# Altium PCB Power-Switcher-v1.0.PcbDoc
Units mil, origin at the board's own origin, x right, y up, seen from the top; angles counter-clockwise.
Board outline 3175 x 2355.83 mil, 2 copper layers (Top Layer, Bottom Layer), stack 61.811 mil thick; 33 components, 17 nets, 84 pads, 15 vias.
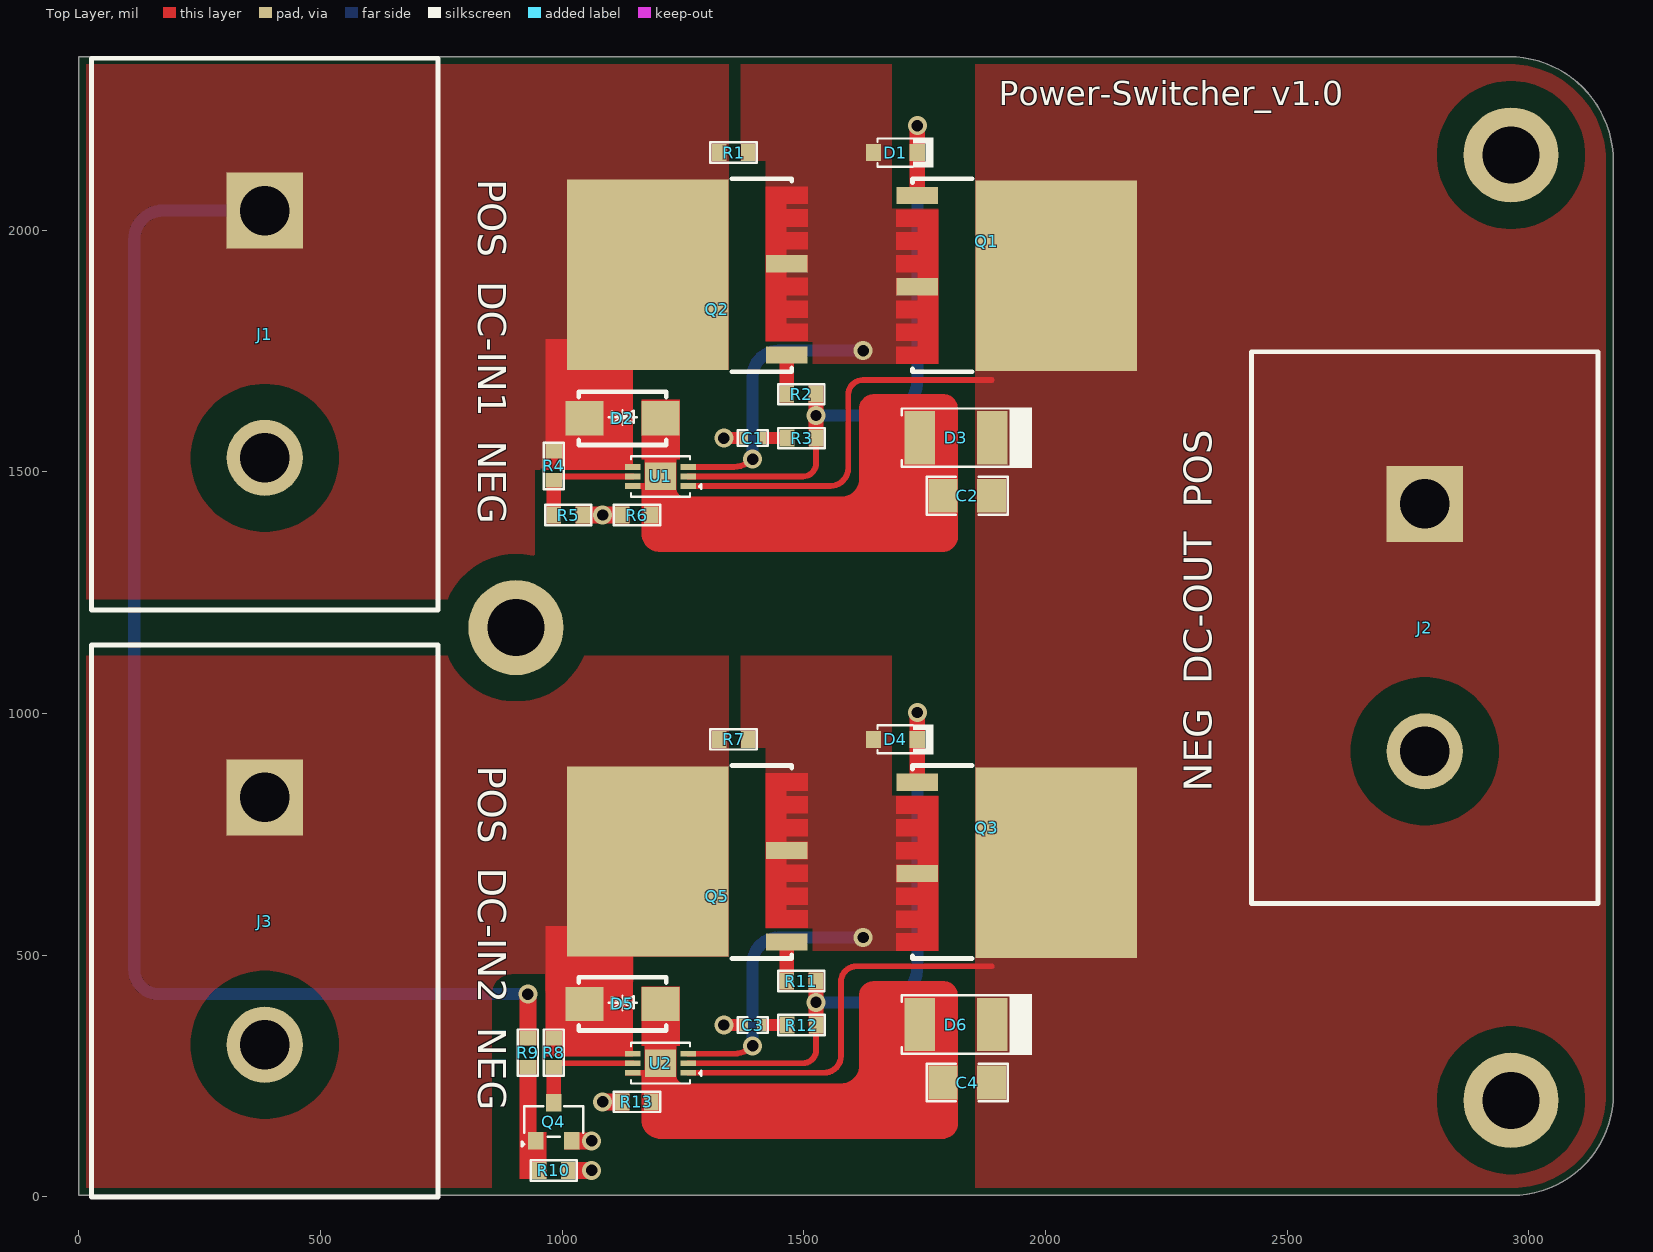
[diagram p0: Top Layer view]
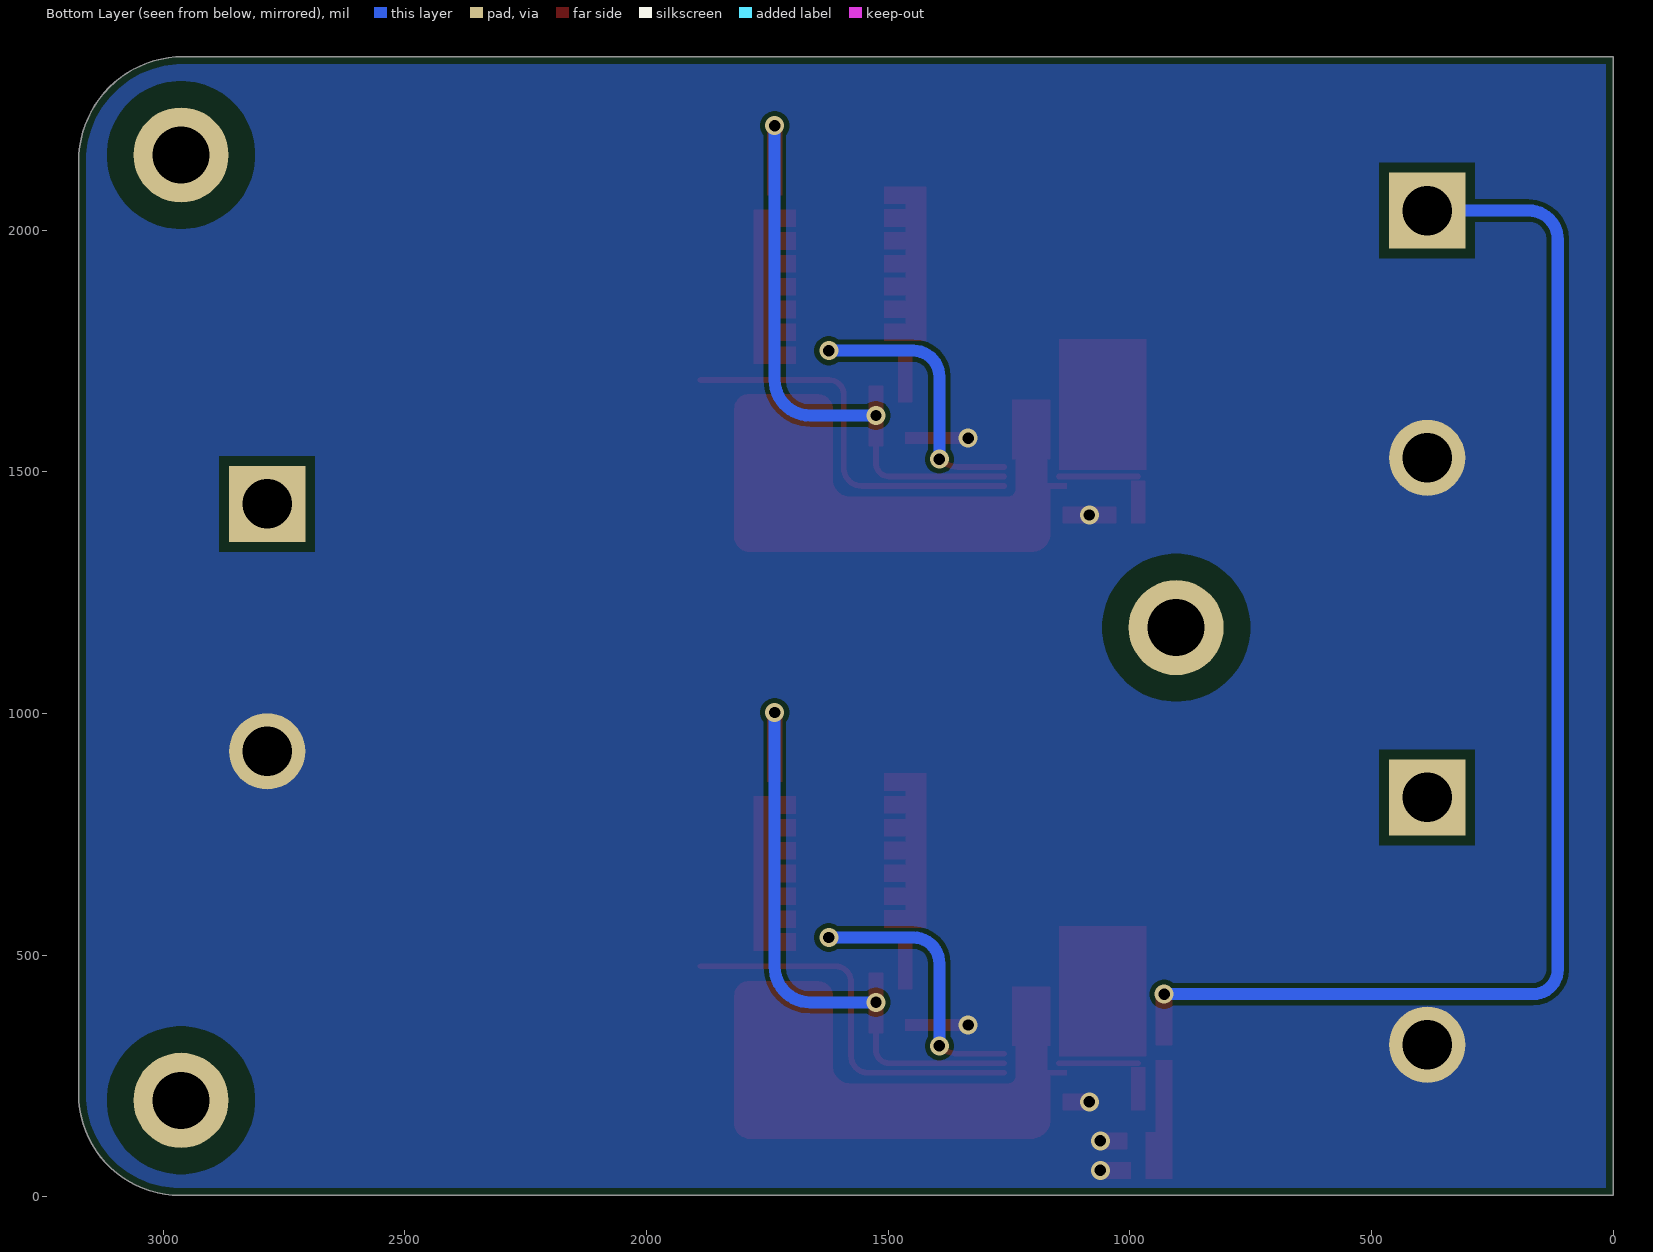
[diagram p1: Bottom Layer view, seen from below]
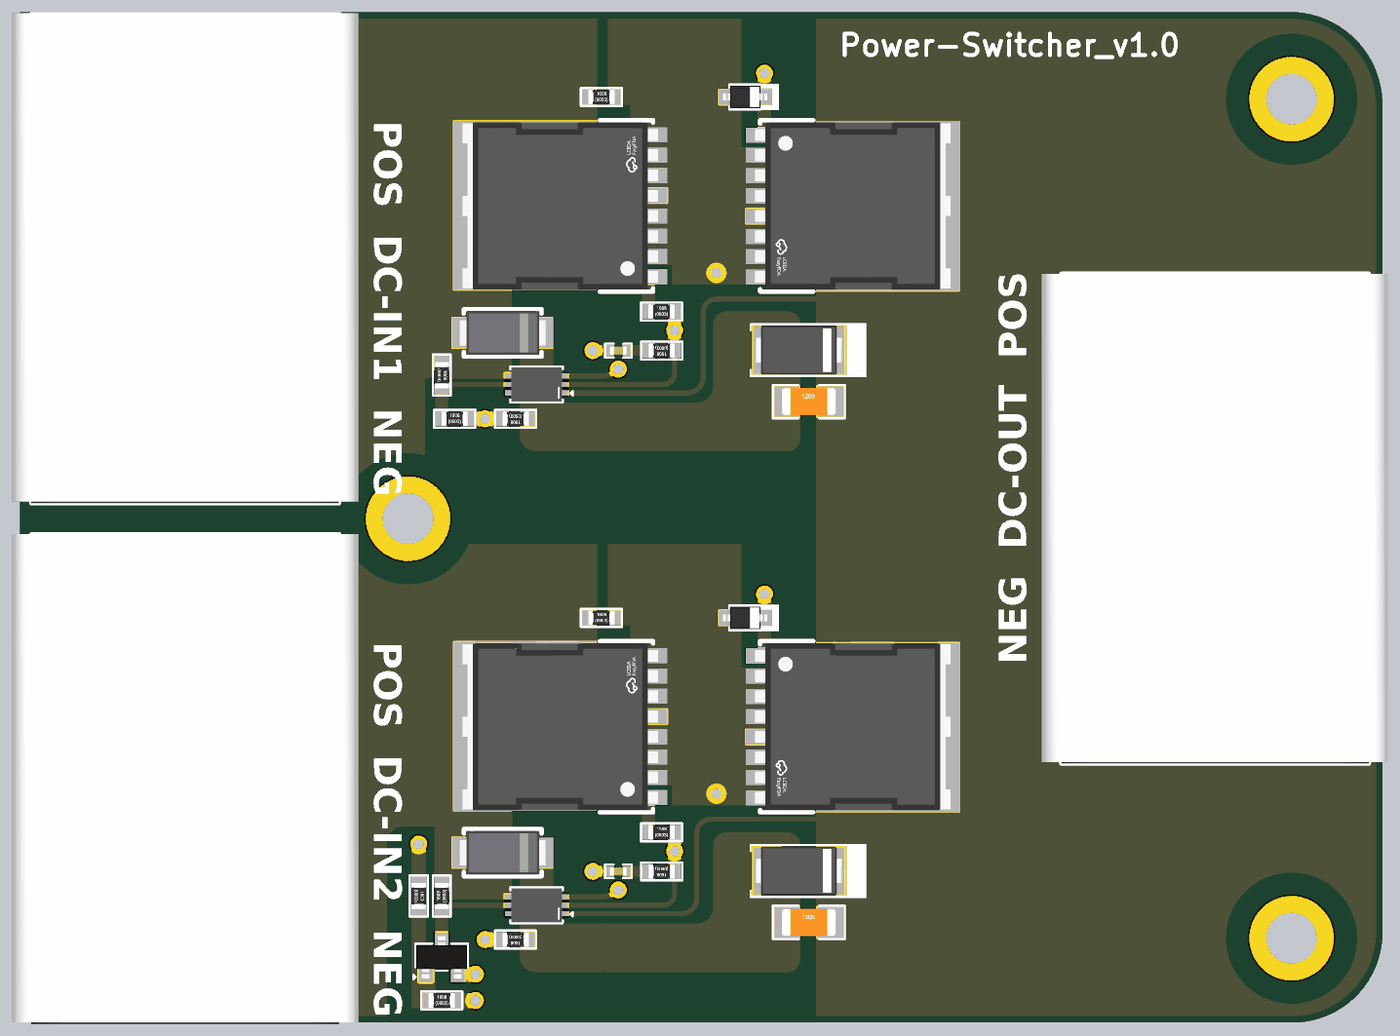
[diagram p2: 3D render of the assembled board from above, using the file's embedded part models]

## Layer stack, top to bottom
Top Solder: solder mask 0.394, Solder Resist, Dk 3.5
Top Layer: signal copper 1.378
Dielectric 1: dielectric 59.055, FR-4, Dk 4.6
Bottom Layer: signal copper 1.378
Bottom Solder: solder mask 0.394, Solder Resist, Dk 3.5

## Board outline
0,3.33 0,2359.16 2896.54,2359.16 2958.5,2359.16 cw(c2958.5,2142.66) 3175,2142.66 3175,212.99 cw(c2965.33,212.99) 2965.33,3.33 2922.67,3.33 2896.54,3.33

## Design rules (kind name [scope] priority, off if disabled: settings)
BoardOutlineClearance [All] p1: gap=0 ignorepadtopadclearanceinfootprint=FALSE except(10: Arc-OutlineEdge SMDPad-OutlineEdge THPad-OutlineEdge Via-OutlineEdge Fill-OutlineEdge; 15: Poly-OutlineEdge)
Clearance Clearance_DIFF [InAnyDifferentialPair] p1: gap=10 ignorepadtopadclearanceinfootprint=FALSE except(6: Arc-SMDPad Track-SMDPad SMDPad-SMDPad; 7: Arc-Track Arc-Fill Track-Track Track-Via Track-Fill Track-Region Track-Text SMDPad-Fill SMDPad-Region THPad-THPad Fill-Fill; 8: Region-Region; 20: THPad-Poly Fill-Poly Poly-Poly Poly-Region)
Clearance [All] p2: gap=10 ignorepadtopadclearanceinfootprint=FALSE except(4: SMDPad-SMDPad; 6: Arc-SMDPad Track-SMDPad; 7: Arc-Track Arc-Fill Track-Track Track-Via Track-Fill Track-Region Track-Text SMDPad-Fill SMDPad-Region THPad-THPad Fill-Fill; 8: Region-Region; 20: THPad-Poly Fill-Poly Poly-Poly Poly-Region)
ComponentClearance [All] p1: gap=0 collisioncheckmode=3 verticalgap=0 showdistances=FALSE
DiffPairsRouting DIFF_CAN1 [InDifferentialPairClass('DIFF_CAN')] p1: maxlimit=7 minlimit=7 mostfreqgap=7 toplayer_minwidth=7 toplayer_maxwidth=7 toplayer_prefwidth=7 bottomlayer_minwidth=7 bottomlayer_maxwidth=7 bottomlayer_prefwidth=7 impedanceprofiledriven=TRUE impedanceprofileid={AF431588-A3C0-40A6-A26B-CB03469C8758} impedanceprofilevalue=120.000000 maxuncoupledlength=500
DiffPairsRouting DIFF_RS485 [InDifferentialPairClass('DIFF_RS485')] p2: maxlimit=7 minlimit=7 mostfreqgap=7 toplayer_minwidth=7 toplayer_maxwidth=7 toplayer_prefwidth=7 bottomlayer_minwidth=7 bottomlayer_maxwidth=7 bottomlayer_prefwidth=7 impedanceprofiledriven=TRUE impedanceprofileid={AF431588-A3C0-40A6-A26B-CB03469C8758} impedanceprofilevalue=120.000000 maxuncoupledlength=500
HoleSize [All] p1: absolutevalues=TRUE maxlimit=137.8 minlimit=1 maxpercent=80.000 minpercent=20.000
MinimumSolderMaskSliver [All] p1: minsoldermaskwidth=0
PolygonConnect [All] p1: connectstyle=Direct reliefconductorwidth=10 reliefentries=4 polygonreliefangle="90 Angle" airgapwidth=10
RoutingVias [All] p1: holewidth=11.81 width=23.62 viastyle="Through Hole" minholewidth=7.87 minwidth=15.75 maxholewidth=23.62 maxwidth=39.37
SilkToSilkClearance [All] p1: silktosilkclearance=0
SilkToSolderMaskClearance [IsPad] p1: minsilkscreentomaskgap=0 clearancetoexposedcopper=TRUE
SolderMaskExpansion [All] p1: expansion=4 istentingtop=FALSE
SupplyNets "Schematic Supply Nets_5" [InNet('IN-2')] p1: voltage=0.000
SupplyNets "Schematic Supply Nets_4" [InNet('IN-1')] p2: voltage=0.000
SupplyNets "Schematic Supply Nets_3" [InNet('12V')] p3: voltage=0.000
SupplyNets "Schematic Supply Nets_7" [InNet('GND')] p4: voltage=0.000
Width [All] p1: maxlimit=100 minlimit=4 preferedwidth=6 minimp=50.000000 maximp=50.000000 favimp=50.000000
24 further rules are at their usual default settings.

## Components (designator, comment, footprint, x,y, rotation, side; value= is the part's Value field where it differs from the comment)
C1 "10nF" Cap-0402 1394.32,1569.86 r0 top
C2 "0.047uF" Cap-1206 1838.31,1450.87 r0 top
C3 "10nF" Cap-0402 1394.32,355.77 r0 top
C4 "0.047uF" Cap-1206 1838.34,236.8 r0 top
D1 "MMSZ5242BS-7-F" SOD-323 1689.72,2160.87 r180 top
D2 "SMAJ24CA" "SMA Bi Directional" 1125,1610.87 r180 top
D3 "S1B-13-F" SMA(DO-214AC) 1815,1570.87 r180 top
D4 "MMSZ5242BS-7-F" SOD-323 1689.72,946.77 r180 top
D5 "SMAJ24CA" "SMA Bi Directional" 1125.08,399.45 r180 top
D6 "S1B-13-F" SMA(DO-214AC) 1815,356.77 r180 top
J1 "KF78C-13.0-2P" KF78C-13.0-2P 385,1784.96 r270 top
J2 "KF78C-13.0-2P" KF78C-13.0-2P 2785,1177.91 r270 top
J3 "KF78C-13.0-2P" KF78C-13.0-2P 385,570.87 r270 top
Q1 "AOTL66912" Tolla 1878.7,1977.71 r270 top
Q2 "AOTL66912" Tolla 1321.3,1836.38 r90 top
Q3 "AOTL66912" Tolla 1878.7,763.62 r270 top
Q4 "MMBTA06-7-F" SOT-23 982.86,155.5 r0 top
Q5 "AOTL66912" Tolla 1321.3,622.28 r90 top
R1 "DNP" Res-0603 1355,2160.87 r180 top value=100kR
R2 "10R" Res-0603 1495,1660.87 r180 top
R3 "10K" Res-0603 1495.51,1569.86 r0 top
R4 "1K" Res-0603 982.86,1512.55 r90 top
R5 "10K" Res-0603 1012.86,1410.87 r180 top
R6 "1K" Res-0603 1155,1410.87 r0 top
R7 "DNP" Res-0603 1355,946.77 r180 top value=100kR
R8 "10K" Res-0603 982.86,298.46 r270 top
R9 "10K" Res-0603 929.32,298.46 r90 top
R10 "100K" Res-0603 982.86,54.87 r180 top value=100kR
R11 "10R" Res-0603 1495,446.77 r180 top
R12 "10K" Res-0603 1495.51,355.77 r0 top
R13 "1K" Res-0603 1155,196.77 r0 top
U1 "LTC4359HDCB#TRPBF" DFN-6-EP(2x3) 1203.74,1490.87 r180 top
U2 "LTC4359HDCB#TRPBF" DFN-6-EP(2x3) 1203.74,276.77 r180 top

## Footprints (in the part's own frame and the unit in brackets; to place one, negate y for a bottom-side part, rotate by r counter-clockwise, add the part's x,y. Pads: shape width x height; smd on the part's side, far side on the other; paste and mask are expansions set on the pad)
Cap-0402 [mil]
  rect 18x25 smd mask+2.36: 1(-18.5,0) 2(18.5,0)
  silkscreen extent -31,-16 31,16, body extent -20,-10 20,10, height 19
Cap-1206 [mil] "SMD 1206"
  rect 60x70 smd: 1(-50,0) 2(50,0)
  silkscreen extent -84,-39 84,39, body extent -63,-31 63,32, height 39
DFN-6-EP(2x3) [mil]
  rect 32x12 smd: 1(-57,19.69) 2(-57,0) 3(-57,-19.68) 4(57,-19.68) 5(57,0) 6(57,19.69)
  rect 65x57 smd: 7(0,0)
  silkscreen extent -85,-42 61,42, body extent -59,-39 59,39, height 31
KF78C-13.0-2P [mm]
  rect 4x4 hole 2.6 paste-2539.97 mask+0.051: 1(-6.5,0)
  round 4 hole 2.6 paste-2539.97 mask+0.051: 2(6.5,0)
  silkscreen extent -14.5,-9.1 14.5,9.1, body extent -14.5,-10.25 14.5,10.25, height 22
Res-0603 [mil]
  rect 30x35 smd: 1(-30,0) 2(30,0)
  silkscreen extent -48,-21 48,21, body extent -31,-17 31,17, height 18
"SMA Bi Directional" [mm]
  rect 2x1.8 smd paste+0 mask+0.051: 1(-2,0) 2(2,0)
  silkscreen extent -2.3,-1.4 2.3,1.4, body extent -2.6,-1.3 2.6,1.3, height 2.4
SMA(DO-214AC) [mm]
  rect 1.6x2.8 smd: 1(-1.9,0) 2(1.9,0)
  silkscreen extent -3.99,-1.6 2.84,1.6, body extent -2.6,-1.45 2.6,1.45, height 2.3
SOD-323 [mm]
  rect 0.8x0.9 smd mask+0.055: 1(-1.15,0) 2(1.15,0)
  silkscreen extent -2.01,-0.79 0.94,0.79, body extent -1.3,-0.67 1.3,0.67, height 1.1
SOT-23 [mm] "TRANS NPN 40V 0.6A SOT23"
  rect 0.82x0.92 smd: 1(-0.95,-1) 2(0.95,-1) 3(0,1)
  silkscreen extent -1.68,-1.3 1.55,0.81, body extent -1.5,-1.25 1.5,1.25, height 1.05
Tolla [mm]
  rect 0.9x2.2 smd paste-100 mask+0.05: 1(-2.4,-3.65) 2(2.4,-3.65)
  rect 10x8.5 smd paste-100 mask+0.05: 3(1.825,3.65)
  Top Layer region: -1.65,-2.55 -1.65,-4.75 -1.65,-4.75 -0.75,-4.75 -0.75,-4.75 -0.75,-3.615 -0.75,-3.615 -0.45,-3.615 -0.45,-3.615 -0.45,-4.75 -0.45,-4.75 0.45,-4.75 0.45,-4.75 0.45,-3.615 0.45,-3.615 0.75,-3.615 0.75,-3.615 0.75,-4.75 0.75,-4.75 1.65,-4.75 1.65,-4.75 1.65,-3.615 1.65,-3.615 1.95,-3.615 1.95,-3.615 1.95,-4.75 1.95,-4.75 2.85,-4.75 2.85,-4.75 2.85,-3.615 2.85,-3.615 3.15,-3.615 3.15,-3.615 3.15,-4.75 3.15,-4.75 4.05,-4.75 4.05,-4.75 4.05,-3.615 4.05,-3.615 4.35,-3.615 4.35,-3.615 4.35,-4.75 4.35,-4.75 5.25,-4.75 5.25,-4.75 5.25,-3.615 5.25,-3.615 5.55,-3.615 5.55,-3.615 5.55,-4.75 5.55,-4.75 6.45,-4.75 6.45,-4.75 6.45,-3.615 6.45,-3.615 6.45,-3.615 6.45,-3.615 6.45,-2.551 6.45,-2.551 6.45,-2.551 6.45,-2.551 6.45,-2.55 6.45,-2.55 5.55,-2.55 5.55,-2.55 5.55,-2.551 5.55,-2.551 5.25,-2.551 5.25,-2.551 5.25,-2.55 5.25,-2.55 4.35,-2.55 4.35,-2.55 4.35,-2.551 4.35,-2.551 4.05,-2.551 4.05,-2.551 4.05,-2.55 4.05,-2.55 3.15,-2.55 3.15,-2.55 3.15,-2.551 3.15,-2.551 2.85,-2.551 2.85,-2.551 2.85,-2.55 2.85,-2.55 1.95,-2.55 1.95,-2.55 1.95,-2.551 1.95,-2.551 1.65,-2.551 1.65,-2.551 1.65,-2.55 1.65,-2.55 0.75,-2.55 0.75,-2.55 0.75,-2.551 0.75,-2.551 0.45,-2.551 0.45,-2.551 0.45,-2.55 0.45,-2.55 -0.45,-2.55 -0.45,-2.55 -0.45,-2.551 -0.45,-2.551 -0.75,-2.551 -0.75,-2.551 -0.75,-2.55 -0.75,-2.55 -1.65,-2.55 -1.65,-2.55
  silkscreen extent -3.28,-3.91 6.86,-0.76, body extent -3.16,-4.21 6.74,7.37, height 2.32

## Part data
C1 C3: library part CC0402KRX7R0BB103, "CAP CER 10000PF 100V X7R 0402", Case/Package=0402, LCSC Part Number=C527014, Manufacturer=Yageo, Max Operating Temperature=125°C, Min Operating Temperature=-55°C, Tolerance=10%, Voltage Rating=100V, ComponentLink1Description=https://datasheet.octopart.com/CC0402KRX7R0BB103-Yageo-datasheet-166511530.pdf?src-supplier=Future+Electronics, ComponentLink1URL=https://datasheet.octopart.com/CC0402KRX7R0BB103-Yageo-datasheet-166511530.pdf?src-supplier=Future+Electronics, ComponentLink2Description=https://datasheet.octopart.com/CC0402KRX7R0BB103-Yageo-datasheet-153410991.pdf?src-supplier=Farnell, ComponentLink2URL=https://datasheet.octopart.com/CC0402KRX7R0BB103-Yageo-datasheet-153410991.pdf?src-supplier=Farnell, Height=550um, Item Type=Capacitors, Manufacturer Part Number=CC0402KRX7R0BB103, Material=Ceramic, Pricing="10000=0.0098, 20000=0.0097, 30000=0.0092, 50000=0.0091, 100000=0.009, 250000=0.0089 (USD)", RoHS=Yes, RoHS Compliant=Yes, Stock=60000, Supplier="Arrow Electronics"
C2 C4: library part CC1206JRX7R0BB473, "CAP CER 0.047UF 100V X7R 1206", Capacitance=47nF, Case Code (Imperial)=1206, Case Code (Metric)=3216, Dielectric=X7R, LCSC Part Number=C577197, Manufacturer=Yageo, Max Operating Temperature=125°C, Min Operating Temperature=-55°C, Resistor Type=Ceramic, Tolerance=5%, Voltage Rating=100V, Case/Package=1206, Category="Ceramic Capacitors", ComponentLink1Description=https://datasheet.ciiva.com/11465/upy-np0x7r-mv-100-to-630v-9-11465413.pdf?src-supplier=Avnet, ComponentLink1URL=https://datasheet.ciiva.com/11465/upy-np0x7r-mv-100-to-630v-9-11465413.pdf?src-supplier=Avnet, ComponentLink2Description=https://datasheet.ciiva.com/13210/upy-gp-np0-16v-to-50v-8-13210277.pdf?src-supplier=Mouser, ComponentLink2URL=https://datasheet.ciiva.com/13210/upy-gp-np0-16v-to-50v-8-13210277.pdf?src-supplier=Mouser, Construction=Flat, Depth=1.6mm, Height=0.85mm, Item Type=Capacitor, Length=3.2mm, Manufacturer Part Number=CC1206JRX7R0BB473, Mount="Surface Mount", Packaging="Tape and Reel", Pricing 1="1=0.21620, 10=0.10530, 25=0.10420, 100=0.08480, 250=0.08390, 500=0.05860, 1000=0.05090, 3000=0.04900, 6000=0.02930 (USD)", Radiation Hardening=No, RoHS=Yes, RoHS Compliant=Yes, Series=CC, Stock 1=6600, Supplier 1="Arrow Electronics", Supplier Part Number 1=CC1206JRX7R0BB473, Termination=SMD/SMT, Thickness=0.037inch, Voltage Rating (DC)=100V, Width=1.6mm
D1 D4: "DIODE ZENER 12V 200MW SOD323", LCSC Part Number=C151457, Manufacturer=Diodes, ComponentLink1Description=https://datasheet.ciiva.com/4734/ds31038-62930-4734288.pdf?src-supplier=Mouser, ComponentLink1URL=https://datasheet.ciiva.com/4734/ds31038-62930-4734288.pdf?src-supplier=Mouser, ComponentLink2Description=https://datasheet.ciiva.com/892/ds31038-892105.pdf?src-supplier=Digikey, ComponentLink2URL=https://datasheet.ciiva.com/892/ds31038-892105.pdf?src-supplier=Digikey, ComponentLink3Description=https://datasheet.ciiva.com/892/ds31038-892106.pdf?src-supplier=Digikey, ComponentLink3URL=https://datasheet.ciiva.com/892/ds31038-892106.pdf?src-supplier=Digikey, ComponentLink4Description=https://datasheet.ciiva.com/892/ds31038-892107.pdf?src-supplier=Digikey, ComponentLink4URL=https://datasheet.ciiva.com/892/ds31038-892107.pdf?src-supplier=Digikey, ComponentLink5Description=https://datasheet.ciiva.com/8347/ds31038-8347977.pdf?src-supplier=Avnet, ComponentLink5URL=https://datasheet.ciiva.com/8347/ds31038-8347977.pdf?src-supplier=Avnet, Item Type=Diodes, Manufacturer Part Number=MMSZ5242BS-7-F, Pricing="3000=0.0228, 9000=0.022, 15000=0.0216, 60000=0.0206, 90000=0.02 (USD)", RoHS=Yes, Stock=15000, Supplier="Future Electronics"
D2 D5: "TVS DIODE 24VWM 38.9VC DO214AC", Case/Package=DO-214AC, Clamping Voltage=38.9V, LCSC Part Number=C148223, Leakage Current=1uA, Manufacturer=Littelfuse, Max Breakdown Voltage=29.5V, Max Operating Temperature=150°C, Max Power Dissipation=3.3W, Min Breakdown Voltage=26.7V, Min Operating Temperature=-65°C, Peak Pulse Current=10.3A, Peak Pulse Power=400W, Power Line Protection=No, Reverse Standoff Voltage=24V, Test Current=1mA, Clamping Voltage-Max=38.9V, ComponentLink1Description=https://datasheet.ciiva.com/28473/607617-28473406.pdf?src-supplier=Element14, ComponentLink1URL=https://datasheet.ciiva.com/28473/607617-28473406.pdf?src-supplier=Element14, ComponentLink2Description=https://datasheet.ciiva.com/331/littelfuse-tvs-diode-smaj-datasheet-pdf-331049.pdf?src-supplier=Digikey, ComponentLink2URL=https://datasheet.ciiva.com/331/littelfuse-tvs-diode-smaj-datasheet-pdf-331049.pdf?src-supplier=Digikey, ComponentLink3Description=https://datasheet.ciiva.com/331/littelfuse-tvs-diode-smaj-datasheet-pdf-331050.pdf?src-supplier=Digikey, ComponentLink3URL=https://datasheet.ciiva.com/331/littelfuse-tvs-diode-smaj-datasheet-pdf-331050.pdf?src-supplier=Digikey, ComponentLink4Description=https://datasheet.ciiva.com/331/littelfuse-tvs-diode-smaj-datasheet-pdf-331048.pdf?src-supplier=Digikey, ComponentLink4URL=https://datasheet.ciiva.com/331/littelfuse-tvs-diode-smaj-datasheet-pdf-331048.pdf?src-supplier=Digikey, Diode Type=ZENER, Direction=Bidirectional, Height=2.29mm, Item Type="TVS Diodes", Lead Free="Lead Free", Length=5.28mm, Manufacturer Part Number=SMAJ24CA, Max Reverse Leakage Current=1uA, Mounting Technology="Surface Mount", Number of Bidirectional Channels=1, Number of Elements=1, Packaging="Tape and Reel", Pins=2, Polarity=Bidirectional, Power Dissipation=400W, Pricing="1=0.31, 10=0.21, 100=0.104, 500=0.1, 1000=0.099, 2000=0.09895 (USD)", Reach SVHC Compliant=No, Reverse Breakdown Voltage=26.7V, Reverse Voltage=24V, RoHS=Yes, RoHS Compliant=Yes, Series=SMAJ, Stock=31613, Supplier=Digikey, Voltage Rating (DC)=24V, Width=2.79mm
D3 D6: "DIODE STANDARD 100V 1A SMA", LCSC Part Number=C156295, Manufacturer=Diodes, ComponentLink1Description=https://datasheet.ciiva.com/911/ds16003-911864.pdf?src-supplier=Digikey, ComponentLink1URL=https://datasheet.ciiva.com/911/ds16003-911864.pdf?src-supplier=Digikey, ComponentLink2Description=https://datasheet.ciiva.com/911/ds16003-911865.pdf?src-supplier=Digikey, ComponentLink2URL=https://datasheet.ciiva.com/911/ds16003-911865.pdf?src-supplier=Digikey, ComponentLink3Description=https://datasheet.ciiva.com/911/ds16003-911866.pdf?src-supplier=Digikey, ComponentLink3URL=https://datasheet.ciiva.com/911/ds16003-911866.pdf?src-supplier=Digikey, Item Type=Diodes, Manufacturer Part Number=S1B-13-F, Pricing="5000=0.0176, 15000=0.0172, 25000=0.017, 100000=0.0165, 150000=0.0162 (USD)", RoHS=Yes, Stock=350000, Supplier="Future Electronics"
J1 J2 J3: "1x2P Midfoot Barrier Block 2 1 13mm 40A -40℃~+105℃ 750V Black 10~18 Straight pin 6 Plugin,P=13mm Barrier Terminal Blocks ROHS", LCSC Part Number=C707721, Manufacturer="CiXi KaiFeng Electronics", Item Type="Terminal Block", Manufacturer Part Number=KF78C-13.0-2P, RoHS=No, Supplier=LCSC
Q1 Q2 Q3 Q5: "MOSFET N-CH 100V 49A/380A TOLLA", Continuous Drain Current (ID)=380A, Drain to Source Breakdown Voltage=100V, Drain to Source Resistance=1.4mR, Gate to Source Voltage (Vgs)=20V, LCSC Part Number=C3291324, Manufacturer="Alpha & Omega Semiconductor", Max Operating Temperature=175°C, Min Operating Temperature=-55°C, Power Dissipation=8.3W, Drain to Source Voltage (Vdss)=100V, Height=2.4mm, Item Type=MOSFET, Manufacturer Part Number=AOTL66912, Number of Channels=1NUMBER, Pricing="1=7.98, 10=5.427, 100=4.1846 (USD)", RoHS=Yes, Stock=5626, Supplier=Digikey, Turn-Off Delay Time=90ns, Turn-On Delay Time=36ns
Q4: "TRANS NPN 80V 0.5A SOT23-3", Current Rating=500mA, LCSC Part Number=C151597, Manufacturer=Diodes, Voltage Rating (DC)=80V, ComponentLink1Description=https://datasheet.ciiva.com/19482/1540800-19482686.pdf?src-supplier=Jameco, ComponentLink1URL=https://datasheet.ciiva.com/19482/1540800-19482686.pdf?src-supplier=Jameco, ComponentLink2Description=https://datasheet.ciiva.com/15139/getdatasheetpartid-116057-15139325.pdf?src-supplier=Verical, ComponentLink2URL=https://datasheet.ciiva.com/15139/getdatasheetpartid-116057-15139325.pdf?src-supplier=Verical, ComponentLink3Description=https://datasheet.ciiva.com/972/ds30037-972971.pdf?src-supplier=Digikey, ComponentLink3URL=https://datasheet.ciiva.com/972/ds30037-972971.pdf?src-supplier=Digikey, ComponentLink4Description=https://datasheet.ciiva.com/972/ds30037-972972.pdf?src-supplier=Digikey, ComponentLink4URL=https://datasheet.ciiva.com/972/ds30037-972972.pdf?src-supplier=Digikey, ComponentLink5Description=https://datasheet.ciiva.com/972/ds30037-972973.pdf?src-supplier=Digikey, ComponentLink5URL=https://datasheet.ciiva.com/972/ds30037-972973.pdf?src-supplier=Digikey, ComponentLink6Description=https://datasheet.ciiva.com/11197/ds30037-11197413.pdf?src-supplier=Avnet, ComponentLink6URL=https://datasheet.ciiva.com/11197/ds30037-11197413.pdf?src-supplier=Avnet, ComponentLink7Description=https://datasheet.ciiva.com/4723/ds30037-4723212.pdf?src-supplier=Mouser, ComponentLink7URL=https://datasheet.ciiva.com/4723/ds30037-4723212.pdf?src-supplier=Mouser, ComponentLink8Description=https://datasheet.ciiva.com/22711/1915521-22711756.pdf?src-supplier=Element14, ComponentLink8URL=https://datasheet.ciiva.com/22711/1915521-22711756.pdf?src-supplier=Element14, ComponentLink9Description=https://datasheet.ciiva.com/16298/ds30037-16298441.pdf?src-supplier=Future+Electronics, ComponentLink9URL=https://datasheet.ciiva.com/16298/ds30037-16298441.pdf?src-supplier=Future+Electronics, Item Type=BJTs, Lead Free=5697LeadFree, Manufacturer Part Number=MMBTA06-7-F, Pricing="3000=0.021, 9000=0.0202, 30000=0.0194, 60000=0.019, 120000=0.0182 (USD)", RoHS=Yes, Stock=573000, Supplier="Future Electronics"
R1 R7 R10: library part RC0603FR-07100KL, "RES 100K OHM 1% 1/10W 0603", Case Code (Imperial)=0603, Case Code (Metric)=1608, LCSC Part Number=C14675, Manufacturer=Yageo, Max Operating Temperature=155°C, Max Power Dissipation=100mW, Min Operating Temperature=-55°C, Package Quantity=5000, Resistance Tolerance=1%, Resistor Type="Thick Film", Supplier Part Number=2424020, Temperature Coefficient=100ppm/°C, Voltage Rating=50V, Case/Package=0603, Category="Chip SMD Resistors", ComponentLink1Description=https://datasheet.ciiva.com/11819/0900766b80f96399-11819227.pdf?src-supplier=Rs, ComponentLink1URL=https://datasheet.ciiva.com/11819/0900766b80f96399-11819227.pdf?src-supplier=Rs, ComponentLink2Description=https://datasheet.ciiva.com/2455/pyu-r-int-thick-7-2455183.pdf?src-supplier=Digikey, ComponentLink2URL=https://datasheet.ciiva.com/2455/pyu-r-int-thick-7-2455183.pdf?src-supplier=Digikey, ComponentLink3Description=https://datasheet.ciiva.com/2455/pyu-r-int-thick-7-2455184.pdf?src-supplier=Digikey, ComponentLink3URL=https://datasheet.ciiva.com/2455/pyu-r-int-thick-7-2455184.pdf?src-supplier=Digikey, ComponentLink4Description=https://datasheet.ciiva.com/2455/pyu-r-int-thick-7-2455182.pdf?src-supplier=Digikey, ComponentLink4URL=https://datasheet.ciiva.com/2455/pyu-r-int-thick-7-2455182.pdf?src-supplier=Digikey, Construction=Rectangular, Depth=0.8mm, Features="Moisture Resistant", Height=0.45mm, Item Type=Resistors, Lead Free=5697LeadFree, Length=1.6mm, Manufacturer Part Number=RC0603FR-07100KL, Military Standard=Not, Mounting Technology="Surface Mount", Number of Terminations=2, Packaging="Tape and Reel", Pins=2, Power Rating=100mW, Reach SVHC Compliant=No, RoHS=Yes, RoHS Compliant=Yes, Series=RC, Stock=27300, Supplier=Rs, Technology="THICK FILM", Termination=SMD/SMT, Tolerance=1%, Voltage Rating (DC)=50V, Weight=7.1E-05oz, Width=0.8mm
R2 R11: library part RC0603FR-0710RL, "RES SMD 10 OHM 1% 1/10W 0603", Case Code (Imperial)=0603, Case Code (Metric)=1608, LCSC Part Number=C109318, Manufacturer=Yageo, Max Operating Temperature=155°C, Min Operating Temperature=-55°C, Power Rating=100mW, Supplier Part Number 1=311-10.0HRDKR-ND, Temperature Coefficient=200ppm/°C, Tolerance=1%, Voltage Rating=50V, Case/Package=0603, ComponentLink1Description=http://www.farnell.com/datasheets/1868787.pdf?src-supplier=Element14, ComponentLink1URL=http://www.farnell.com/datasheets/1868787.pdf?src-supplier=Element14, ComponentLink2Description=http://www.yageo.com/documents/recent/PYu-RC0603_51_RoHS_L_4.pdf?src-supplier=Avnet, ComponentLink2URL=http://www.yageo.com/documents/recent/PYu-RC0603_51_RoHS_L_4.pdf?src-supplier=Avnet, ComponentLink3Description=http://documents.rs-components.com/techlib://itc_doclist_GB.htm?stockno=5048984&src-supplier=RSComponents, ComponentLink3URL=http://documents.rs-components.com/techlib://itc_doclist_GB.htm?stockno=5048984&src-supplier=RSComponents, ComponentLink4Description=http://www.yageo.com/documents/recent/PYu-RC0603_51_RoHS_L_4.pdf?src-supplier=Avnet+Europe, ComponentLink4URL=http://www.yageo.com/documents/recent/PYu-RC0603_51_RoHS_L_4.pdf?src-supplier=Avnet+Europe, Composition="Thick Film", Contact Plating=Tin,Matte, Depth=0.8mm, Height=0.45mm, Item Type=Resistor, Lead Free="Lead Free", Length=1.6mm, Manufacturer Part Number=RC0603FR-0710RL, Military Standard=Not, Number of Pins=2, Packaging="Tape and Reel", Pricing 1="1=0.1, 10=0.046, 100=0.0187, 1000=0.0084, 2500=0.00729 (USD)", Radiation Hardening=No, REACH SVHC="No SVHC", Resistance=10R, Stock 1=10836596, Supplier 1=Digi-Key, Termination=SMD/SMT, Voltage Rating (DC)=50V, Width=0.8mm
R3 R5 R8 R9 R12: library part RC0603FR-0710KL, "RES SMD 10K Ohm 1% 1/10W 0603", Case Code (Imperial)=0603, Case Code (Metric)=1608, LCSC Part Number=C98220, Manufacturer=Yageo, Max Operating Temperature=155°C, Max Power Dissipation=100mW, Min Operating Temperature=-55°C, Resistance=10kR, Resistance Tolerance=1%, Resistor Type="Thick Film", Supplier Part Number 1=311-10.0KHRCT-ND, Temperature Coefficient=100ppm/°C, Voltage Rating=75V, Voltage Rating (DC)=50V, Case/Package=0603, Category="Chip SMD Resistors", ComponentLink1Description=https://datasheet.ciiva.com/7660/38590-7660789.pdf?src-supplier=Element14, ComponentLink1URL=https://datasheet.ciiva.com/7660/38590-7660789.pdf?src-supplier=Element14, ComponentLink2Description=https://datasheet.ciiva.com/7983/443971-7983596.pdf?src-supplier=Element14, ComponentLink2URL=https://datasheet.ciiva.com/7983/443971-7983596.pdf?src-supplier=Element14, ComponentLink3Description=https://datasheet.ciiva.com/22747/443971-22747519.pdf?src-supplier=Element14, ComponentLink3URL=https://datasheet.ciiva.com/22747/443971-22747519.pdf?src-supplier=Element14, ComponentLink4Description=https://datasheet.ciiva.com/46440/1868787-46440891.pdf?src-supplier=Element14, ComponentLink4URL=https://datasheet.ciiva.com/46440/1868787-46440891.pdf?src-supplier=Element14, ComponentLink5Description=https://datasheet.ciiva.com/7746/1738695-7746239.pdf?src-supplier=Element14, ComponentLink5URL=https://datasheet.ciiva.com/7746/1738695-7746239.pdf?src-supplier=Element14, ComponentLink6Description=https://datasheet.ciiva.com/15189/getdatasheetpartid-409289-15189591.pdf?src-supplier=Verical, ComponentLink6URL=https://datasheet.ciiva.com/15189/getdatasheetpartid-409289-15189591.pdf?src-supplier=Verical, Construction=Rectangular, Depth=0.8mm, Features="Moisture Resistant", Height=0.45mm, Item Type=Resistor, Lead Free="Lead Free", Lead Pitch=0.3mm, Length=1.6mm, Manufacturer Part Number=RC0603FR-0710KL, Military Standard=Not, Number of Pins=2, Number of Terminations=2, Packaging="Tape and Reel", Power Rating=100mW, Pricing 1="1=0.10000, 10=0.02400, 100=0.00970, 1000=0.00436, 2500=0.00378 (USD)", REACH SVHC=Unknown, RoHS=Yes, RoHS Compliant=Yes, Series=RC, Size Code=0603, Stock 1=25249139, Supplier 1=Digi-Key, Termination=SMD/SMT, Tolerance=1%, Weight=7.1E-05oz, Width=0.8mm
R4 R6 R13: library part RC0603FR-071KL, "RES SMD 1K OHM 1% 1/10W 0603", Case Code (Imperial)=0603, Case Code (Metric)=1608, LCSC Part Number=C22548, Manufacturer=Yageo, Max Operating Temperature=155°C, Min Operating Temperature=-55°C, Power Rating=100mW, Resistance=1kR, Supplier Part Number 1=311-1.00KHRDKR-ND, Temperature Coefficient=100ppm/°C, Tolerance=1%, Voltage Rating=50V, Case/Package=0603, ComponentLink1Description=https://www.verical.com/server-webapp/html/getDatasheet?partID=409289&src-supplier=Verical, ComponentLink1URL=https://www.verical.com/server-webapp/html/getDatasheet?partID=409289&src-supplier=Verical, ComponentLink2Description=http://documents.rs-components.com/techlib://itc_doclist_GB.htm?stockno=5048928&src-supplier=RSComponents, ComponentLink2URL=http://documents.rs-components.com/techlib://itc_doclist_GB.htm?stockno=5048928&src-supplier=RSComponents, ComponentLink3Description=http://www.yageo.com/documents/recent/PYu-RC0603_51_RoHS_L_4.pdf?src-supplier=Avnet+Europe, ComponentLink3URL=http://www.yageo.com/documents/recent/PYu-RC0603_51_RoHS_L_4.pdf?src-supplier=Avnet+Europe, ComponentLink4Description=http://www.farnell.com/datasheets/2167052.pdf?src-supplier=Element14, ComponentLink4URL=http://www.farnell.com/datasheets/2167052.pdf?src-supplier=Element14, ComponentLink5Description=http://www.farnell.com/datasheets/1868787.pdf?src-supplier=Element14, ComponentLink5URL=http://www.farnell.com/datasheets/1868787.pdf?src-supplier=Element14, ComponentLink6Description=http://www.yageo.com/documents/recent/PYu-RC_Group_51_RoHS_L_2.pdf?src-supplier=Avnet, ComponentLink6URL=http://www.yageo.com/documents/recent/PYu-RC_Group_51_RoHS_L_2.pdf?src-supplier=Avnet, ComponentLink7Description=https://www.verical.com/server-webapp/html/getDatasheet?partID=404327&src-supplier=Verical, ComponentLink7URL=https://www.verical.com/server-webapp/html/getDatasheet?partID=404327&src-supplier=Verical, ComponentLink8Description=http://www.farnell.com/datasheets/443971.pdf?src-supplier=Element14, ComponentLink8URL=http://www.farnell.com/datasheets/443971.pdf?src-supplier=Element14, Composition="Thick Film", Contact Plating=Tin,Matte, Depth=0.8mm, Height=0.45mm, Item Type=Resistor, Lead Free="Lead Free", Length=1.6mm, Manufacturer Part Number=RC0603FR-071KL, Military Standard=Not, Packaging="Tape and Reel", Pricing 1="1=0.1, 10=0.023, 100=0.0094, 1000=0.0042, 2500=0.0037 (USD)", Radiation Hardening=No, REACH SVHC="No SVHC", Stock 1=21472395, Supplier 1=Digi-Key, Termination=SMD/SMT
U1 U2: "IC OR CTRLR N+1 6DFN", LCSC Part Number=C688238, Manufacturer="Analog Devices / Linear Technology", ComponentLink1Description=https://datasheet.ciiva.com/6609/4359fb-6609308.pdf?src-supplier=Digikey, ComponentLink1URL=https://datasheet.ciiva.com/6609/4359fb-6609308.pdf?src-supplier=Digikey, Item Type=IC, Manufacturer Part Number=LTC4359HDCB#TRPBF, Pricing="1=9.31, 10=6.3, 50=5.51, 100=4.62, 1000=4.17, 10000=4.16 (USD)", RoHS=Yes, Stock=1133, Supplier=Mouser

## Free pads (board coordinates)
  round 196.85 hole 118.11: MH(904.4,1177.91) MH(2963.27,200) MH(2963.27,2155.83)

## Via types
v1: diameter 39.37, hole 23.62, Top Layer to Bottom Layer, 15 vias

## Nets (pads, with @x,y where several pads share a name; then routed paths per layer and width w, separated by ;. In a path a pad name is that pad's centre, name@x,y a point inside that pad or via, vN(x,y) a via of type N, cw(c..) or ccw(c..) an arc to the next point about the centre after c; other vN are vias at no path point)
12V: C2.2 C4.2 D3.1 D6.1 J2.1 Q1.3 Q3.3 U1.1 U2.1 | length 1636.6
  Top Layer w12: U2.1 1542.22,257.09 ccw(c1542.22,291.82) 1576.95,291.82 1576.95,444.95 cw(c1609.35,444.95) 1609.35,477.35 1888.25,477.35 ; U1.1 1555.31,1471.18 ccw(c1555.31,1507.87) 1592,1507.87 1592,1659.65 cw(c1622.44,1659.65) 1622.44,1690.09 1888.25,1690.09
GND: C1.1 C3.1 J1.2 J2.2 J3.2 Q4.2 R5.1 R6.1 R10.1 R13.1 | length 0
  other v1: 1061.33,54.87 1061.33,116.13 1083.93,196.77 1335,355.77 1083.93,1410.87 1335,1569.86
IN-1: D2.2 J1.1 Q2.3 R1.2 R4.2 R9.2 U1.4 | length 2657.9
  Bottom Layer w25: J1.1 175,2040.87 ccw(c175,1980.87) 115,1980.87 115,470.87 ccw(c166.34,470.87) 166.34,419.53 v1(929.32,419.53)
IN-2: D5.2 J3.1 Q5.3 R7.2 R8.1 U2.4
NetC1_2: C1.2 R3.1
NetC2_1: C2.1 D2.1 D3.2 R6.2 U1.6 U1.7
NetC3_2: C3.2 R12.1
NetC4_1: C4.1 D5.1 D6.2 R13.2 U2.6 U2.7
NetD1_1: D1.1 Q1.1 R2.1 R3.2 U1.2 | length 1109.8
  Top Layer w12: U1.2 1498.51,1490.87 ccw(c1498.51,1517.87) 1525.51,1517.87 R3.2
  Bottom Layer w25: v1(1525.51,1616.86) 1661.94,1616.86 ccw(c1661.94,1689.92) 1735,1689.92 v1(1735,2216.36)
NetD1_2: D1.2 Q1.2 Q2.2 R1.1 U1.3 | length 567.9
  Top Layer w12: U1.3 1355.69,1510.55 ccw(c1355.69,1565.18) v1(1394.32,1526.55)
  Bottom Layer w25: v1(1394.32,1526.55) 1394.32,1697.22 cw(c1448,1697.22) 1448,1750.9 v1(1623.06,1750.9)
NetD4_1: D4.1 Q3.1 R11.1 R12.2 U2.2 | length 1109.7
  Top Layer w12: U2.2 1498.51,276.77 ccw(c1498.51,303.77) 1525.51,303.77 R12.2
  Bottom Layer w25: v1(1525.51,402.77) 1661.71,402.77 ccw(c1661.71,476.06) 1735,476.06 v1(1735,1002.26)
NetD4_2: D4.2 Q3.2 Q5.2 R7.1 U2.3 | length 567.9
  Top Layer w12: U2.3 1355.69,296.46 ccw(c1355.69,351.08) v1(1394.32,312.46)
  Bottom Layer w25: v1(1394.32,312.46) 1394.32,483.12 cw(c1448,483.12) 1448,536.8 v1(1623.06,536.8)
NetQ2_1: Q2.1 R2.2
NetQ4_1: Q4.1 R9.1 R10.2
NetQ5_1: Q5.1 R11.2
SHDN-1: R4.1 R5.2 U1.5 | length 163.9
  Top Layer w12: R4.1@982.86,1490.87 U1.5
SHDN-2: Q4.3 R8.2 U2.5 | length 163.9
  Top Layer w12: R8.2@982.86,276.77 U2.5

## Polygon pours and split planes (outlines as drawn)
NetD4_2 on Top Layer "NONET_L-01_P-001" (solid, pour order 6): 1370,1119.45 1370,929.27 1421.69,929.27 1421.69,509.68 1778.31,509.68 1778.31,830.39 1681.69,830.39 1681.69,1119.45
NetD1_2 on Top Layer "NONET_L-01_P-001" (solid, pour order 9): 1370,2359.16 1370,2143.37 1421.69,2143.37 1421.69,1723.78 1778.31,1723.78 1778.31,2044.48 1681.69,2044.48 1681.69,2359.16
12V on Top Layer "NONET_L-01_P-001" (solid, pour order 0): 1855.08,2355.83 2962.07,2355.83 cw(c2965.62,2146.2) 3175,2156.98 3175,200.22 cw(c2956.23,219.54) 2950.12,0 1855.08,0
IN-2 on Top Layer "NONET_L-01_P-001" (solid, pour order 7): 855,3.33 855,420.87 cw(c895,420.87) 895,460.87 965.36,460.87 965.36,295.35 1145.64,295.35 ccw(c1145.83,296.65) 1147.12,296.46 1147.12,497.28 1344.92,497.28 1344.92,1119.45 0,1119.45 0,3.33
IN-1 on Top Layer "NONET_L-01_P-001" (solid, pour order 3): 1146.14,1504.55 943.94,1504.55 943.94,1236.37 0,1236.37 0,2355.83 1344.92,2355.83 1344.92,1711.38 1146.14,1711.38
GND on Bottom Layer "NONET_L-01_P-001" (solid, pour order 1): 0,0 0,2355.83 2963.27,2355.83 cw(c2963.27,2155.83) 3163.27,2155.83 3163.27,200 cw(c2963.27,200) 2963.27,0

## Other copper
Top Layer:
  rectangle net NetD4_1: 1719.25,858.11 1750.75,1002.26
  rectangle net NetD1_1: 1719.25,2072.2 1750.75,2216.36
  region net IN-1: 911.82,419.53 911.82,313.46 946.82,313.46 946.82,419.53
  region net GND: 1061.33,72.37 997.86,72.37 997.86,37.37 1061.33,37.37
  region net GND: 1061.33,133.63 1005.26,133.63 1005.26,98.63 1061.33,98.63
  rectangle net NetQ4_1: 911.82,37.37 967.86,134.24
  rectangle net NetQ4_1: 911.82,98.02 946.82,283.46
  rectangle net SHDN-2: 967.86,179.27 997.86,268.46
  rectangle net GND: 1083.93,179.27 1140,214.27
  rectangle net SHDN-1: 967.86,1393.37 997.86,1482.55
  rectangle net GND: 1027.86,1393.37 1140,1428.37
  rectangle net IN-1: 965.36,1504.55 1146.74,1774.96
  rectangle net IN-2: 965.36,290.46 1146.74,560.87
  rectangle net NetC2_1: 1130.74,1465.18 1203.74,1477.18
  rectangle net NetC4_1: 1130.74,251.09 1203.74,263.09
  rectangle net NetC1_2: 1403.82,1557.37 1465.51,1582.37
  rectangle net NetQ2_1: 1450,1643.37 1480,1741.89
  rectangle net GND: 1335,1557.37 1384.82,1582.37
  rectangle net NetD1_1: 1510,1552.36 1540.51,1678.37
  rectangle net NetD4_1: 1510,338.27 1540.51,464.27
  rectangle net GND: 1335,343.27 1384.82,368.27
  rectangle net NetQ5_1: 1450,429.27 1480,527.8
  rectangle net NetC3_2: 1403.82,343.27 1465.51,368.27
  pour cut-out: 385,1376.29 cw(c385,1529.06) 232.23,1529.06 cw(c385,1529.06) 385,1681.82 cw(c385,1529.06) 537.76,1529.06 cw(c385,1529.06)
  pour cut-out: 385,162.2 cw(c385,314.96) 232.23,314.96 cw(c385,314.96) 385,467.73 cw(c385,314.96) 537.76,314.96 cw(c385,314.96)
  region net NetC2_1: 1236.24,1465.32 ccw(c1252.69,1465.32) 1252.69,1448.87 1577.97,1448.87 1581.6,1449.04 1588.72,1450.46 1595.43,1453.24 1601.46,1457.27 1606.59,1462.4 1610.63,1468.44 1613.4,1475.15 1614.82,1482.27 1615,1485.9 1615,1630.42 1615,1633.42 1616.17,1639.3 1618.46,1644.84 1621.8,1649.83 1626.04,1654.07 1631.02,1657.4 1636.56,1659.7 1642.44,1660.87 1645.44,1660.87 1789.09,1660.87 1791.97,1660.87 1797.62,1659.74 1802.95,1657.54 1807.74,1654.34 1811.81,1650.26 1815.01,1645.47 1817.21,1640.15 1818.18,1635.32 1818.34,1631.63 1818.34,1364.96 1818.34,1362.01 1817.18,1356.21 1814.92,1350.75 1811.64,1345.84 1807.46,1341.66 1802.55,1338.38 1797.09,1336.11 1791.29,1334.96 1788.34,1334.96 1202.74,1334.96 1198.97,1334.96 1191.57,1336.43 1184.6,1339.32 1178.33,1343.51 1173,1348.84 1168.81,1355.11 1165.92,1362.08 1164.45,1369.48 1164.45,1373.25 1164.45,1474.87 1171.24,1474.87 1171.24,1526.55 1164.45,1526.55 1164.45,1648.98 1243.19,1648.98 1243.19,1526.55 1236.24,1526.55
  region net NetC4_1: 1236.24,251.22 ccw(c1252.69,251.22) 1252.69,234.77 1577.97,234.77 1581.6,234.95 1588.72,236.37 1595.43,239.14 1601.46,243.18 1606.59,248.31 1610.63,254.35 1613.4,261.05 1614.82,268.17 1615,271.8 1615,416.33 1615,419.33 1616.17,425.21 1618.46,430.75 1621.8,435.74 1626.04,439.98 1631.02,443.31 1636.56,445.6 1642.44,446.77 1645.44,446.77 1789.09,446.77 1791.97,446.77 1797.62,445.65 1802.95,443.44 1807.74,440.24 1811.81,436.17 1815.01,431.38 1817.21,426.06 1818.18,421.22 1818.34,417.53 1818.34,150.87 1818.34,147.91 1817.18,142.12 1814.92,136.66 1811.64,131.74 1807.46,127.56 1802.55,124.28 1797.09,122.02 1791.29,120.87 1788.34,120.87 1202.74,120.87 1198.97,120.87 1191.57,122.34 1184.6,125.22 1178.33,129.41 1173,134.75 1168.81,141.02 1165.92,147.99 1164.45,155.39 1164.45,159.16 1164.45,260.77 1171.24,260.77 1171.24,312.46 1164.45,312.46 1164.45,434.88 1243.19,434.88 1243.19,312.46 1236.24,312.46
  pour cut-out: 2785,769.24 cw(c2785,922.01) 2632.23,922.01 cw(c2785,922.01) 2785,1074.77 cw(c2785,922.01) 2937.76,922.01 cw(c2785,922.01)
Multi-Layer:
  pour cut-out: 2963.27,47.24 cw(c2963.27,200) 2810.5,200 cw(c2963.27,200) 2963.27,352.77 cw(c2963.27,200) 3116.03,200 cw(c2963.27,200)
  pour cut-out: 2963.27,2003.06 cw(c2963.27,2155.83) 2810.5,2155.83 cw(c2963.27,2155.83) 2963.27,2308.59 cw(c2963.27,2155.83) 3116.03,2155.83 cw(c2963.27,2155.83)
  pour cut-out: 904.4,1025.15 cw(c904.4,1177.91) 751.63,1177.91 cw(c904.4,1177.91) 904.4,1330.68 cw(c904.4,1177.91) 1057.16,1177.91 cw(c904.4,1177.91)

## Silkscreen, mask and mechanical layers (free items; w line width, h text height)
Top Overlay:
  text "Power-Switcher_v1.0" at 1904,2258.2 h50
  text "POS  DC-IN1  NEG" at 806.65,2105.75 h100 r270
  text "POS  DC-IN2  NEG" at 806.65,891.66 h100 r270
  text "NEG  DC-OUT  POS" at 2363.34,838.86 h100 r90
Board Outline:
  lines w10: 0,3.33 ccw(c0,3.33) 0,3.33 ; 0,3.33 2896.54,3.33 2922.67,3.33 ; 0,3.33 0,2359.16 2896.54,2359.16 2934.41,2359.16 2958.5,2359.16 cw(c2958.5,2142.66) 3175,2142.66 3175,212.99 cw(c2965.33,212.99) 2965.33,3.33 2922.67,3.33 ; 2922.67,3.33 ccw(c2922.67,3.33) 2922.67,3.33
Fabrication:
  drawing of 191 lines, arcs and shapes, not listed
  text "Layer" at 3750.58,2270 h60
  text "Name" at 4160.49,2270 h60
  text "Material" at 5090.23,2270 h60
  text "Thickness" at 5950,2270 h60
  text "Constant" at 6599.84,2270 h60
  text "Board Layer Stack" at 7169.7,2270 h60
  text "Top Overlay" at 4160.49,2150 h60
  text "Top Solder" at 4160.49,2030 h60
  text "Solder Resist" at 5090.23,2030 h60
  text "0.010mm" at 5950,2030 h60
  text "3.5" at 6599.84,2030 h60
  text "1" at 3750.58,1910 h60
  text "Top Layer" at 4160.49,1910 h60
  text "0.035mm" at 5950,1910 h60
  text "Dielectric 1" at 4160.49,1790 h60
  text "FR-4" at 5090.23,1790 h60
  text "1.500mm" at 5950,1790 h60
  text "4.6" at 6599.84,1790 h60
  text "2" at 3750.58,1670 h60
  text "Bottom Layer" at 4160.49,1670 h60
  text "0.035mm" at 5950,1670 h60
  text "Bottom Solder" at 4160.49,1550 h60
  text "Solder Resist" at 5090.23,1550 h60
  text "0.010mm" at 5950,1550 h60
  text "3.5" at 6599.84,1550 h60
  text "Bottom Overlay" at 4160.49,1430 h60
  text "Total board thickness:" at 3750.58,1310 h60
  text "1.590mm" at 5950,1310 h60
Drill Drawing:
  circle w10: c60.62,3155.83 r33.33
  lines w10: 27.29,3272.5 93.96,3272.5 93.96,3339.17 27.29,3339.17 27.29,3272.5 ; 27.29,3489.17 93.96,3489.17 60.62,3422.5 27.29,3489.17
  lines w15: -32.5,3077.5 6977.6,3077.5 ; -32.5,3527.5 6977.6,3527.5 ; 518.38,2927.5 518.38,3677.5 ; 1058.24,2927.5 1058.24,3677.5 ; 2207.9,2927.5 2207.9,3677.5 ; 2713.78,2927.5 2713.78,3677.5 ; 3447.58,2927.5 3447.58,3677.5 ; 4947.13,2927.5 4947.13,3677.5 ; 5536.98,2927.5 5536.98,3677.5 ; 6282.78,2927.5 6282.78,3677.5 ; -32.5,2927.5 6977.6,2927.5 6977.6,3677.5 -32.5,3677.5 -32.5,2927.5
  text "Symbol" at 57.5,3572.5 h72
  text "Count" at 563.38,3572.5 h72
  text "Hole Size" at 1103.24,3572.5 h72
  text "Plated" at 2252.9,3572.5 h72
  text "Hole Type" at 2758.78,3572.5 h72
  text "Drill Layer Pair" at 3492.58,3572.5 h72
  text "Via/Pad" at 4992.13,3572.5 h72
  text "Pad Shape" at 5581.98,3572.5 h72
  text "Template" at 6327.78,3572.5 h72
  text "3" at 563.38,3422.5 h60
  text "118.11mil (3.000mm)" at 1103.24,3422.5 h60
  text "PTH" at 2252.9,3422.5 h60
  text "Round" at 2758.78,3422.5 h60
  text "Top Layer - Bottom Layer" at 3492.58,3422.5 h60
  text "Pad" at 4992.13,3422.5 h60
  text "Rounded" at 5581.98,3422.5 h60
  text "c500h300" at 6327.78,3422.5 h60
  text "6" at 563.38,3272.5 h60
  text "102.36mil (2.600mm)" at 1103.24,3272.5 h60
  text "PTH" at 2252.9,3272.5 h60
  text "Round" at 2758.78,3272.5 h60
  text "Top Layer - Bottom Layer" at 3492.58,3272.5 h60
  text "Pad" at 4992.13,3272.5 h60
  text "(Mixed)" at 5581.98,3272.5 h60
  text "(Mixed)" at 6327.78,3272.5 h60
  text "15" at 563.38,3122.5 h60
  text "23.62mil (0.600mm)" at 1103.24,3122.5 h60
  text "PTH" at 2252.9,3122.5 h60
  text "Round" at 2758.78,3122.5 h60
  text "Top Layer - Bottom Layer" at 3492.58,3122.5 h60
  text "Via" at 4992.13,3122.5 h60
  text "Rounded" at 5581.98,3122.5 h60
  text "v100h60" at 6327.78,3122.5 h60
  text "24 Total" at 563.38,2972.5 h60

## Dimensions
2934.41,2359.16 to 2896.54,3.33 on Dimensions
-18.54,2355.83 to 3175,2142.66 on Dimensions